# Altium PCB OmniCore_SDR.PcbDoc (part 2 of 13)
Units mil, origin at the board's own origin, x right, y up, seen from the top; angles counter-clockwise.
Board outline 4724.72 x 2755.91 mil, 8 copper layers (Top, GND 1, Layer 1, Layer 2, GND 2, Layer 3, Power, Bottom), stack 40.468 mil thick; 530 components, 427 nets, 2315 pads, 1715 vias.
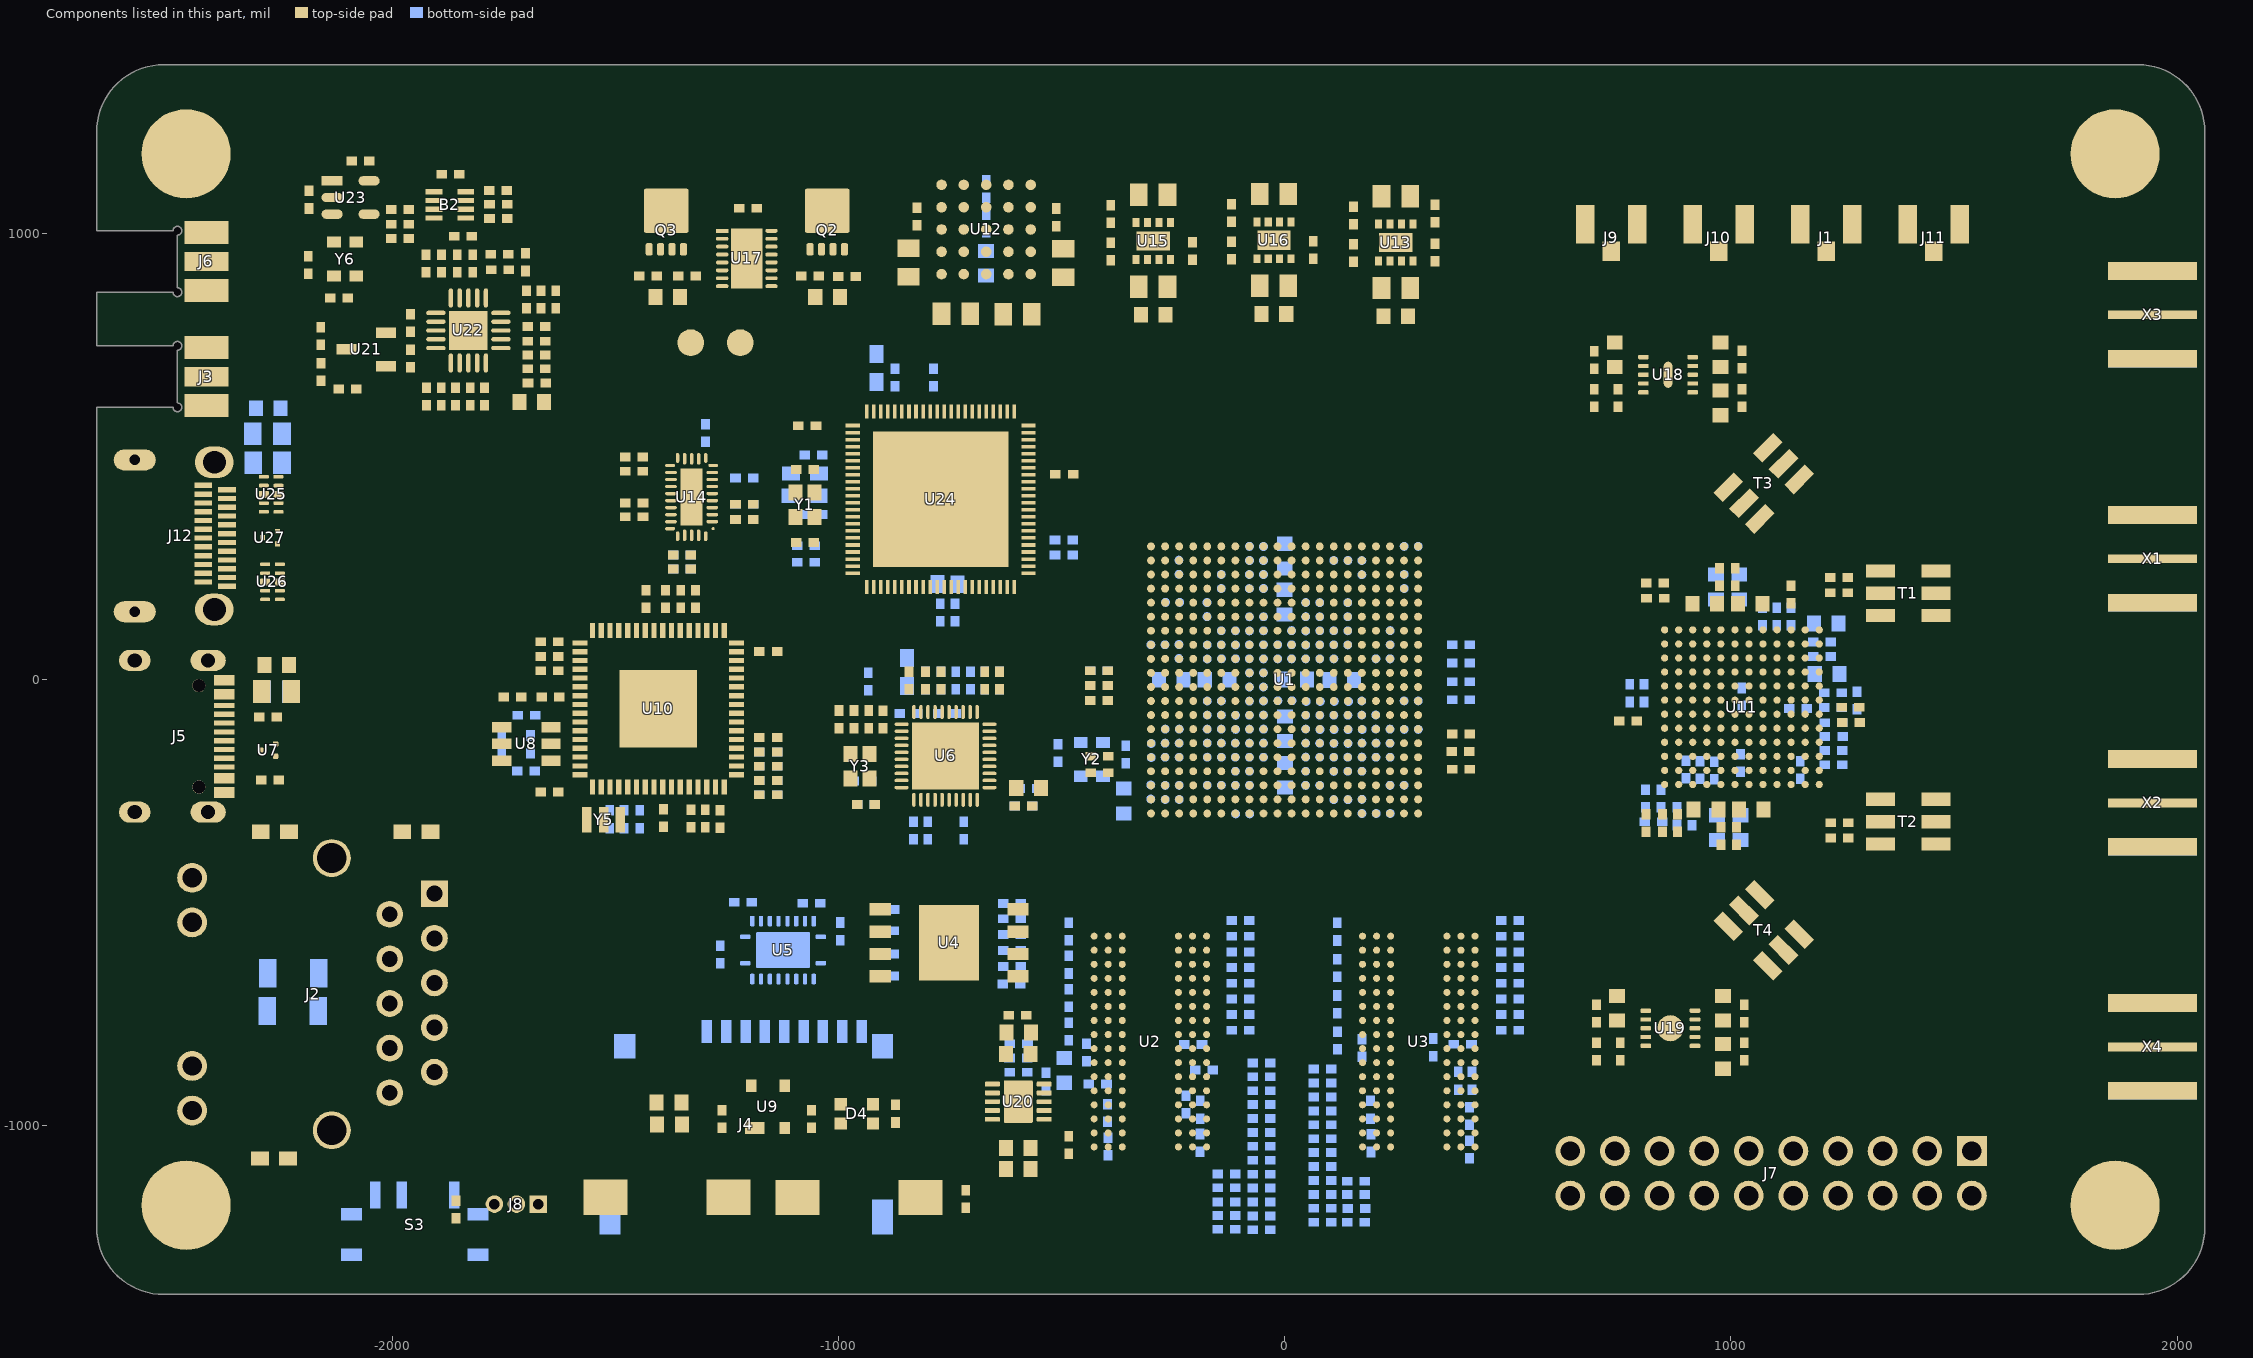
[diagram p8: the components of this part, seen from the top]

## Components (designator, comment, footprint, x,y, rotation, side; value= is the part's Value field where it differs from the comment) (continued)
R125 "R" R0402-L -1858.35,634.35 r90 top value=330
R126 "R" R0402-L -669,1099.69 r270 bottom value=45.5K
R127 "R" R0402-L -389.56,959.69 r270 top value=124K
R128 "R" R0402-L -119,961.37 r270 top value=124K
R129 "R" R0402-L -389.56,1043.69 r270 top value=39.7K
R130 "R" R0402-L -119,1045.37 r270 top value=180K
R131 "R" R0402-L -980.48,903.27 r180 top value=5.1K
R132 "R" R0402-L -1825.35,634.35 r90 top value=330
R133 "R" R0402-L -1793.35,634.35 r90 top value=330
R134 "R" R0402-L -1426.48,904.27 r0 top value=5.1K
R135 "R" R0402-L -1676.66,758.35 r0 top value=5.1k
R136 "R" R0402-L -1923.35,634.35 r90 top value=4.7k
R137 "R" R0402-L -1890.35,634.35 r90 top value=330
R138 "R" R0402-L -1982.35,1020.35 r180 top value=510k
R139 "R" R0402-L -1982.35,1053.35 r180 top value=510k
R140 "R" R0402-L -1763.35,1096.35 r180 top value=49.9
R141 "R" R0402-L -1762.35,1065.35 r180 top value=49.9
R142 "R" R0402-L -1841.03,993.35 r0 top value=49.9
R143 "R" R0402-L 394,-161 r180 top value=220
R144 "R" R0402-L 395,-122 r180 top value=49.9
R145 "R" R1206-L -2223,-743 r0 bottom value=1M
S1 "SW-PB2" SW-PB2-SMD -956,-1161 r270 top
S2 "SW-PB2" SW-PB2-SMD -1386,-1160 r270 top
S3 "SW-SPDT" SW-TH_MSK12C02 -1949.2,-1221.8 r180 bottom
T1 "TCM1-63AX+" FP-TCM1-63AX+-MFG 1397.48,193.46 r270 top
T2 "TCM1-63AX+" FP-TCM1-63AX+-MFG 1397.5,-318.54 r270 top
T3 "TCM1-63AX+" FP-TCM1-63AX+-MFG 1073.76,439.72 r315 top
T4 "TCM1-63AX+" FP-TCM1-63AX+-MFG 1073.5,-561.54 r225 top
TP1 "test point" TP -1220,755 r0 top
TP2 "test point" TP -1331,755 r90 top
U1 "XC7Z020-2CLG400I" CLG400 -0.24,-0.79 r90 top locked
U2 "MT41K256M16TW-107:P" FP-TW-IPC_C -300.99,-811.22 r0 top
U3 "MT41K256M16TW-107:P" FP-TW-IPC_C 300.51,-811.22 r0 top
U4 "W25Q256" WPDFN-8_L8.0-W6.0-P1.27-EP-BL -752,-590 r270 top
U5 "TXS0108ERGYR" FP-RGY0020A-MFG -1124.21,-606.04 r270 bottom
U6 "RTL8211FD-CG" WQFN-40_L5.0-W5.0-P0.4-BL-EP -760,-171 r0 top
U7 "TPD2EUSB30DRTR" DRT0003A -2278,-158 r180 top
U8 "93LC56BT-I/OT" FP-C04-028-MFG -1699.34,-144 r0 top
U9 "HX811T" SOT-143_L2.9-W1.3-P1.92-LS2.3-BL -1158.1,-957.7 r0 top
U10 "FT2232HQ" QFN50P900X900X90-65N-D -1403.54,-65.47 r90 top
U11 "AD9361" BGA144C80P12X12_1000X1000X170 1024.74,-61.79 r180 top locked
U12 "LTM4622EY#PBF" FP-BGA-25-05-08-1502-IPC_C -669,1008.69 r90 top
U13 "TPS82130SILT" SIL0008D_V 249,979.37 r270 top
U14 "HD3SS3220IRNHT" FP-RNH0030A-IPC_C -1329,409 r180 top
U15 "TPS82130SILT" SIL0008D_V -294.56,982.69 r270 top
U16 "TPS82130SILT" SIL0008D_V -24,984.37 r270 top
U17 "LTC4353IDE#PBF" FP-DE-16-05-08-1732-IPC_C -1205.24,943.69 r0 top
U18 "TPS7A9401DSCR" FP-DSC0010J-MFG#1 859.18,683.13 r0 top
U19 "TPS7A9401DSCR" FP-DSC0010J-MFG#2 864.39,-781.4 r0 top
U20 "TPS51200DRCR" DRC0010J_V -597,-946 r0 top
U21 "BAT54S" SOT-23-3 -2058.35,740.35 r180 top
U22 "ADF4002BCPZ" ADI-CP-20-1_N -1829.35,782.35 r270 top
U23 "SN74LVC1G04DBVRG4" FP-DBV0005A-IPC_C -2093.35,1080.35 r0 top
U24 "CH32H417MEU6" QFN-88_L10.0-W10.0-P0.40-BL-EP7.7 -771,404 r270 top
U25 "TPD4EUSB30DQAR" DQA0010A_V -2271.32,415.24 r0 top
U26 "TPD4EUSB30DQAR" DQA0010A_V -2268.32,218.87 r0 top
U27 "TPD2EUSB30DRTR" DRT0003A -2274,318 r180 top
X1 "SMA" SMA_ANGLE 2030,274.14 r180 top
X2 "SMA" SMA_ANGLE 2030,-272.72 r180 top
X3 "SMA" SMA_ANGLE 2030,821 r180 top
X4 "SMA" SMA_ANGLE 2030,-819.57 r180 top
Y1 "25MHz" CRYSTAL-SMD_4P-L2.0-W1.6-BL -1075,392 r90 top
Y2 "SX2M33.333M20F30TNN" XTAL-2520 -432,-178.8 r90 bottom value=33.333M
Y3 "25MHz" CRYSTAL-SMD_4P-L2.0-W1.6-BL -951.65,-194.44 r90 top
Y5 "12M" XTAL-3Pin -1526.34,-314 r180 top
Y6 "TX0873AA12AE" XTAL-2520 -2105.35,942.35 r90 top value=40M

## Footprints (in the part's own frame and the unit in brackets; to place one, negate y for a bottom-side part, rotate by r counter-clockwise, add the part's x,y. Pads: shape width x height; smd on the part's side, far side on the other; paste and mask are expansions set on the pad)
20279-001E [mm] "贴片天线座"
  rect 1x1.1 smd: 1(0,-1.55)
  rect 1.05x2.2 smd: 2(1.475,0) 3(-1.475,0)
  silkscreen extent -0.75,-2.7 0.75,1.3, body extent -1.5,-1.5 1.5,1.5, height 1.34
66012202111305 [mm] "MMCX PCB End Launch Jack"
  rect 1.1x2.5 smd: 1(0,3.9)
  rect 1.3x2.5 smd paste-2539.97 mask+0.102: 2(-1.65,3.9) 3(1.65,3.9)
  Top region: -2.3,-2.35 -2.3,5.15 -1,5.15 -1,2.25 -1.5,2.25 -1.527,2.363 -1.603,2.452 -1.711,2.497 -1.827,2.488 -1.927,2.427 -1.988,2.327 -1.997,2.211 -1.952,2.103 -1.863,2.027 -1.75,2 -1.75,2 -1.75,2 -1.75,-2.35
  Top region: 2.3,-2.35 2.3,5.15 1,5.15 1,2.25 1.5,2.25 1.527,2.363 1.603,2.452 1.711,2.497 1.827,2.488 1.927,2.427 1.988,2.327 1.997,2.211 1.952,2.103 1.863,2.027 1.75,2 1.75,2 1.75,2 1.75,-2.35
  Keep-Out Layer board cut-out: -1.75,-2.35 1.75,-2.35 1.75,2 1.863,2.027 1.952,2.103 1.997,2.211 1.988,2.327 1.927,2.427 1.827,2.488 1.711,2.497 1.603,2.452 1.527,2.363 1.5,2.25 1.5,2.25 -1.5,2.25 -1.527,2.363 -1.603,2.452 -1.711,2.497 -1.827,2.488 -1.927,2.427 -1.988,2.327 -1.997,2.211 -1.952,2.103 -1.863,2.027 -1.75,2 -1.75,2
  body extent -2.25,-2.25 2.25,5.25, height 2.1
ADI-CP-20-1_N [mm] "QFN, 20-Leads, Body 4x4mm, Pitch 0.5mm, Thermal Pad 2.2x2.2mm, IPC Medium Density"
  oval 1.1x0.25 smd: 1(-1.85,1) 2(-1.85,0.5) 3(-1.85,0) 4(-1.85,-0.5) 5(-1.85,-1) 11(1.85,-1) 12(1.85,-0.5) 13(1.85,0) 14(1.85,0.5) 15(1.85,1)
  oval 0.25x1.1 smd: 6(-1,-1.85) 7(-0.5,-1.85) 8(0,-1.85) 9(0.5,-1.85) 10(1,-1.85) 16(1,1.85) 17(0.5,1.85) 18(0,1.85) 19(-0.5,1.85) 20(-1,1.85)
  rect 2.2x2.2 smd: 21(0,0)
  silkscreen extent -2.97,-2.2 2.2,2.2, body extent -2.05,-2.05 2.05,2.05, height 1
BGA144C80P12X12_1000X1000X170 [mm]
  round 0.41 smd: A1(-4.4,4.4) A2(-3.6,4.4) A3(-2.8,4.4) A4(-2,4.4) A5(-1.2,4.4) A6(-0.4,4.4) A7(0.4,4.4) A8(1.2,4.4) A9(2,4.4) A10(2.8,4.4) A11(3.6,4.4) A12(4.4,4.4) B1(-4.4,3.6) B2(-3.6,3.6) B3(-2.8,3.6) B4(-2,3.6) B5(-1.2,3.6) B6(-0.4,3.6) B7(0.4,3.6) B8(1.2,3.6) B9(2,3.6) B10(2.8,3.6) B11(3.6,3.6) B12(4.4,3.6) C1(-4.4,2.8) C2(-3.6,2.8) C3(-2.8,2.8) C4(-2,2.8) C5(-1.2,2.8) C6(-0.4,2.8) C7(0.4,2.8) C8(1.2,2.8) C9(2,2.8) C10(2.8,2.8) C11(3.6,2.8) C12(4.4,2.8) D1(-4.4,2) D2(-3.6,2) D3(-2.8,2) D4(-2,2) D5(-1.2,2) D6(-0.4,2) D7(0.4,2) D8(1.2,2) D9(2,2) D10(2.8,2) D11(3.6,2) D12(4.4,2) E1(-4.4,1.2) E2(-3.6,1.2) E3(-2.8,1.2) E4(-2,1.2) E5(-1.2,1.2) E6(-0.4,1.2) E7(0.4,1.2) E8(1.2,1.2) E9(2,1.2) E10(2.8,1.2) E11(3.6,1.2) E12(4.4,1.2) F1(-4.4,0.4) F2(-3.6,0.4) F3(-2.8,0.4) F4(-2,0.4) F5(-1.2,0.4) F6(-0.4,0.4) F7(0.4,0.4) F8(1.2,0.4) F9(2,0.4) F10(2.8,0.4) F11(3.6,0.4) F12(4.4,0.4) G1(-4.4,-0.4) G2(-3.6,-0.4) G3(-2.8,-0.4) G4(-2,-0.4) G5(-1.2,-0.4) G6(-0.4,-0.4) G7(0.4,-0.4) G8(1.2,-0.4) G9(2,-0.4) G10(2.8,-0.4) G11(3.6,-0.4) G12(4.4,-0.4) H1(-4.4,-1.2) H2(-3.6,-1.2) H3(-2.8,-1.2) H4(-2,-1.2) H5(-1.2,-1.2) H6(-0.4,-1.2) H7(0.4,-1.2) H8(1.2,-1.2) H9(2,-1.2) H10(2.8,-1.2) H11(3.6,-1.2) H12(4.4,-1.2) J1(-4.4,-2) J2(-3.6,-2) J3(-2.8,-2) J4(-2,-2) J5(-1.2,-2) J6(-0.4,-2) J7(0.4,-2) J8(1.2,-2) J9(2,-2) J10(2.8,-2) J11(3.6,-2) J12(4.4,-2) K1(-4.4,-2.8) K2(-3.6,-2.8) K3(-2.8,-2.8) K4(-2,-2.8) K5(-1.2,-2.8) K6(-0.4,-2.8) K7(0.4,-2.8) K8(1.2,-2.8) K9(2,-2.8) K10(2.8,-2.8) K11(3.6,-2.8) K12(4.4,-2.8) L1(-4.4,-3.6) L2(-3.6,-3.6) L3(-2.8,-3.6) L4(-2,-3.6) L5(-1.2,-3.6) L6(-0.4,-3.6) L7(0.4,-3.6) L8(1.2,-3.6) L9(2,-3.6) L10(2.8,-3.6) L11(3.6,-3.6) L12(4.4,-3.6) M1(-4.4,-4.4) M2(-3.6,-4.4) M3(-2.8,-4.4) M4(-2,-4.4) M5(-1.2,-4.4) M6(-0.4,-4.4) M7(0.4,-4.4) M8(1.2,-4.4) M9(2,-4.4) M10(2.8,-4.4) M11(3.6,-4.4) M12(4.4,-4.4)
  silkscreen extent -5.1,-5 5,5.1, body extent -5,-5 5,5, height 1.7
C0402-L [mm] "Chip Capacitor, Body 1.0x0.5mm, 高密度"
  rect 0.6x0.5 smd: 1(-0.5,0) 2(0.5,0)
  silkscreen extent 0,-0.23 0,0.25, body extent -0.5,-0.25 0.5,0.25, height 0.49
C0402-S [mil] "C0402"
  round 20 smd: 1(-15.7,0) 2(15.9,0)
  silkscreen extent -31,-16 32,16, body extent -20,-10 20,10, height 20
C0603-L [mm] "贴片电容0603 高密度"
  rect 0.8x0.9 smd: 1(-0.7,0) 2(0.7,0)
  silkscreen extent 0,-0.39 0,0.41, body extent -0.8,-0.4 0.8,0.41, height 0.88
C0603-M [mm] "Capacitor SMD 0603 (1608)  低密度"
  rect 1.016x0.8 smd: 1(-0.8,0) 2(0.8,0)
  silkscreen extent 0,-0.39 0,0.41, body extent -0.77,-0.41 0.83,0.4, height 0.88
C0805-L [mil] "贴片电容0805-高密度"
  rect 39.37x50 smd: 1(-32,0) 2(32,0)
  silkscreen extent 0,-24 0,24, body extent -39,-25 39,25, height 24
C1206-L [mm] "Capacitor 1206 (3216) for Startronics  高密度"
  rect 1x1.6 smd: 1(-1.45,0) 2(1.45,0)
  silkscreen extent -0.64,-0.56 0.63,0.58, body extent -1.63,-0.8 1.57,0.8, height 1
CLG400 [mm] "BGA, 400-Balls, Body 17x17mm, Pitch 0.8mm"
  round 0.45 smd: A1(-7.6,7.6) A2(-6.8,7.6) A3(-6,7.6) A4(-5.2,7.6) A5(-4.4,7.6) A6(-3.6,7.6) A7(-2.8,7.6) A8(-2,7.6) A9(-1.2,7.6) A10(-0.4,7.6) A11(0.4,7.6) A12(1.2,7.6) A13(2,7.6) A14(2.8,7.6) A15(3.6,7.6) A16(4.4,7.6) A17(5.2,7.6) A18(6,7.6) A19(6.8,7.6) A20(7.6,7.6) B1(-7.6,6.8) B2(-6.8,6.8) B3(-6,6.8) B4(-5.2,6.8) B5(-4.4,6.8) B6(-3.6,6.8) B7(-2.8,6.8) B8(-2,6.8) B9(-1.2,6.8) B10(-0.4,6.8) B11(0.4,6.8) B12(1.2,6.8) B13(2,6.8) B14(2.8,6.8) B15(3.6,6.8) B16(4.4,6.8) B17(5.2,6.8) B18(6,6.8) B19(6.8,6.8) B20(7.6,6.8) C1(-7.6,6) C2(-6.8,6) C3(-6,6) C4(-5.2,6) C5(-4.4,6) C6(-3.6,6) C7(-2.8,6) C8(-2,6) C9(-1.2,6) C10(-0.4,6) C11(0.4,6) C12(1.2,6) C13(2,6) C14(2.8,6) C15(3.6,6) C16(4.4,6) C17(5.2,6) C18(6,6) C19(6.8,6) C20(7.6,6) D1(-7.6,5.2) D2(-6.8,5.2) D3(-6,5.2) D4(-5.2,5.2) D5(-4.4,5.2) D6(-3.6,5.2) D7(-2.8,5.2) D8(-2,5.2) D9(-1.2,5.2) D10(-0.4,5.2) D11(0.4,5.2) D12(1.2,5.2) D13(2,5.2) D14(2.8,5.2) D16(4.4,5.2) D17(5.2,5.2) D18(6,5.2) D19(6.8,5.2) D20(7.6,5.2) E1(-7.6,4.4) E2(-6.8,4.4) E3(-6,4.4) E4(-5.2,4.4) E5(-4.4,4.4) E6(-3.6,4.4) E7(-2.8,4.4) E8(-2,4.4) E9(-1.2,4.4) E10(-0.4,4.4) E11(0.4,4.4) E12(1.2,4.4) E13(2,4.4) E14(2.8,4.4) E15(3.6,4.4) E16(4.4,4.4) E17(5.2,4.4) E18(6,4.4) E19(6.8,4.4) E20(7.6,4.4) F1(-7.6,3.6) F2(-6.8,3.6) F3(-6,3.6) F4(-5.2,3.6) F5(-4.4,3.6) F6(-3.6,3.6) F7(-2.8,3.6) F8(-2,3.6) F9(-1.2,3.6) F10(-0.4,3.6) F11(0.4,3.6) F12(1.2,3.6) F13(2,3.6) F14(2.8,3.6) F15(3.6,3.6) F16(4.4,3.6) F17(5.2,3.6) F18(6,3.6) F19(6.8,3.6) F20(7.6,3.6) G1(-7.6,2.8) G2(-6.8,2.8) G3(-6,2.8) G4(-5.2,2.8) G5(-4.4,2.8) G6(-3.6,2.8) G7(-2.8,2.8) G8(-2,2.8) G9(-1.2,2.8) G10(-0.4,2.8) G11(0.4,2.8) G12(1.2,2.8) G13(2,2.8) G14(2.8,2.8) G15(3.6,2.8) G16(4.4,2.8) G17(5.2,2.8) G18(6,2.8) G19(6.8,2.8) G20(7.6,2.8) H1(-7.6,2) H2(-6.8,2) H3(-6,2) H4(-5.2,2) H5(-4.4,2) H6(-3.6,2) H7(-2.8,2) H8(-2,2) H9(-1.2,2) H10(-0.4,2) H11(0.4,2) H12(1.2,2) H13(2,2) H14(2.8,2) H15(3.6,2) H16(4.4,2) H17(5.2,2) H18(6,2) H19(6.8,2) H20(7.6,2) J1(-7.6,1.2) J2(-6.8,1.2) J3(-6,1.2) J4(-5.2,1.2) J5(-4.4,1.2) J6(-3.6,1.2) J7(-2.8,1.2) J8(-2,1.2) J9(-1.2,1.2) J10(-0.4,1.2) J11(0.4,1.2) J12(1.2,1.2) J13(2,1.2) J14(2.8,1.2) J15(3.6,1.2) J16(4.4,1.2) J17(5.2,1.2) J18(6,1.2) J19(6.8,1.2) J20(7.6,1.2) K1(-7.6,0.4) K2(-6.8,0.4) K3(-6,0.4) K4(-5.2,0.4) K5(-4.4,0.4) K6(-3.6,0.4) K7(-2.8,0.4) K8(-2,0.4) K9(-1.2,0.4) K10(-0.4,0.4) K11(0.4,0.4) K12(1.2,0.4) K13(2,0.4) K14(2.8,0.4) K15(3.6,0.4) K16(4.4,0.4) K17(5.2,0.4) K18(6,0.4) K19(6.8,0.4) K20(7.6,0.4) L1(-7.6,-0.4) L2(-6.8,-0.4) L3(-6,-0.4) L4(-5.2,-0.4) L5(-4.4,-0.4) L6(-3.6,-0.4) L7(-2.8,-0.4) L8(-2,-0.4) L9(-1.2,-0.4) L10(-0.4,-0.4) L11(0.4,-0.4) L12(1.2,-0.4) L13(2,-0.4) L14(2.8,-0.4) L15(3.6,-0.4) L16(4.4,-0.4) L17(5.2,-0.4) L18(6,-0.4) L19(6.8,-0.4) L20(7.6,-0.4) M1(-7.6,-1.2) M2(-6.8,-1.2) M3(-6,-1.2) M4(-5.2,-1.2) M5(-4.4,-1.2) M6(-3.6,-1.2) M7(-2.8,-1.2) M8(-2,-1.2) M9(-1.2,-1.2) M10(-0.4,-1.2) M11(0.4,-1.2) M12(1.2,-1.2) M13(2,-1.2) M14(2.8,-1.2) M15(3.6,-1.2) M16(4.4,-1.2) M17(5.2,-1.2) M18(6,-1.2) M19(6.8,-1.2) M20(7.6,-1.2) N1(-7.6,-2) N2(-6.8,-2) N3(-6,-2) N4(-5.2,-2) N5(-4.4,-2) N6(-3.6,-2) N7(-2.8,-2) N8(-2,-2) N9(-1.2,-2) N10(-0.4,-2) N11(0.4,-2) N12(1.2,-2) N13(2,-2) N14(2.8,-2) N15(3.6,-2) N16(4.4,-2) N17(5.2,-2) N18(6,-2) N19(6.8,-2) N20(7.6,-2) P1(-7.6,-2.8) P2(-6.8,-2.8) P3(-6,-2.8) P4(-5.2,-2.8) P5(-4.4,-2.8) P6(-3.6,-2.8) P7(-2.8,-2.8) P8(-2,-2.8) P9(-1.2,-2.8) P10(-0.4,-2.8) P11(0.4,-2.8) P12(1.2,-2.8) P13(2,-2.8) P14(2.8,-2.8) P15(3.6,-2.8) P16(4.4,-2.8) P17(5.2,-2.8) P18(6,-2.8) P19(6.8,-2.8) P20(7.6,-2.8) R1(-7.6,-3.6) R2(-6.8,-3.6) R3(-6,-3.6) R4(-5.2,-3.6) R5(-4.4,-3.6) R6(-3.6,-3.6) R7(-2.8,-3.6) R8(-2,-3.6) R9(-1.2,-3.6) R10(-0.4,-3.6) R11(0.4,-3.6) R12(1.2,-3.6) R13(2,-3.6) R14(2.8,-3.6) R15(3.6,-3.6) R16(4.4,-3.6) R17(5.2,-3.6) R18(6,-3.6) R19(6.8,-3.6) R20(7.6,-3.6) T1(-7.6,-4.4) T2(-6.8,-4.4) T3(-6,-4.4) T4(-5.2,-4.4) T5(-4.4,-4.4) T6(-3.6,-4.4) T7(-2.8,-4.4) T8(-2,-4.4) T9(-1.2,-4.4) T10(-0.4,-4.4) T11(0.4,-4.4) T12(1.2,-4.4) T13(2,-4.4) T14(2.8,-4.4) T15(3.6,-4.4) T16(4.4,-4.4) T17(5.2,-4.4) T18(6,-4.4) T19(6.8,-4.4) T20(7.6,-4.4) U1(-7.6,-5.2) U2(-6.8,-5.2) U3(-6,-5.2) U4(-5.2,-5.2) U5(-4.4,-5.2) U6(-3.6,-5.2) U7(-2.8,-5.2) U8(-2,-5.2) U9(-1.2,-5.2) U10(-0.4,-5.2) U11(0.4,-5.2) U12(1.2,-5.2) U13(2,-5.2) U14(2.8,-5.2) U15(3.6,-5.2) U16(4.4,-5.2) U17(5.2,-5.2) U18(6,-5.2) U19(6.8,-5.2) U20(7.6,-5.2) V1(-7.6,-6) V2(-6.8,-6) V3(-6,-6) V4(-5.2,-6) V5(-4.4,-6) V6(-3.6,-6) V7(-2.8,-6) V8(-2,-6) V9(-1.2,-6) V10(-0.4,-6) V11(0.4,-6) V12(1.2,-6) V13(2,-6) V14(2.8,-6) V15(3.6,-6) V16(4.4,-6) V17(5.2,-6) V18(6,-6) V19(6.8,-6) V20(7.6,-6) W1(-7.6,-6.8) W2(-6.8,-6.8) W3(-6,-6.8) W4(-5.2,-6.8) W5(-4.4,-6.8) W6(-3.6,-6.8) W7(-2.8,-6.8) W8(-2,-6.8) W9(-1.2,-6.8) W10(-0.4,-6.8) W11(0.4,-6.8) W12(1.2,-6.8) W13(2,-6.8) W14(2.8,-6.8) W15(3.6,-6.8) W16(4.4,-6.8) W17(5.2,-6.8) W18(6,-6.8) W19(6.8,-6.8) W20(7.6,-6.8) Y1(-7.6,-7.6) Y2(-6.8,-7.6) Y3(-6,-7.6) Y4(-5.2,-7.6) Y5(-4.4,-7.6) Y6(-3.6,-7.6) Y7(-2.8,-7.6) Y8(-2,-7.6) Y9(-1.2,-7.6) Y10(-0.4,-7.6) Y11(0.4,-7.6) Y12(1.2,-7.6) Y13(2,-7.6) Y14(2.8,-7.6) Y15(3.6,-7.6) Y16(4.4,-7.6) Y17(5.2,-7.6) Y18(6,-7.6) Y19(6.8,-7.6) Y20(7.6,-7.6)
  round 0.45 smd mask+0.102: D15(3.6,5.2)
  silkscreen extent -9.27,-8.5 8.5,8.5, body extent -8.5,-8.5 8.5,8.5, height 1.6
CONN-TH_3P-P1.25_CAX_1.25-3A [mm]
  rect 1x1 hole 0.6 paste+0 mask+0.05: 1(-1.25,0)
  round 1 hole 0.6 paste+0 mask+0.05: 2(0,0) 3(1.25,0)
  silkscreen extent -2.76,-2.04 2.75,1.16, body extent -2.83,-2.04 2.83,1.27, height 4.6
CRYSTAL-SMD_4P-L2.0-W1.6-BL [mm]
  rect 0.9x0.8 smd: 1(-0.7,-0.55) 2(0.7,-0.55) 3(0.7,0.55) 4(-0.7,0.55)
  silkscreen extent -1.65,-1.45 1.35,1.15, body extent -1.05,-0.77 0.95,0.83, height 0.8
DQA0010A_V [mm] "SON, 10-Leads, Body 1x2.5mm, Pitch 0.5mm, TI Recommended"
  rrect50% 0.565x0.2 smd: 1(-0.417,1) 2(-0.417,0.5) 4(-0.417,-0.5) 5(-0.417,-1) 6(0.417,-1) 7(0.417,-0.5) 9(0.417,0.5) 10(0.417,1)
  rrect28% 0.565x0.36 on Top Paste: 3(-0.417,0) 8(0.417,0)
  rrect25% 0.565x0.4 smd paste-0.2: 3(-0.417,0) 8(0.417,0)
  silkscreen extent -0.67,-1.45 0.55,1.45, body extent -0.55,-1.3 0.55,1.3, height 0.56
DRC0010J_V [mm] "SON, 10-Leads, Body 3x3mm, Pitch 0.5mm, Thermal Pad 2.4x1.65mm, TI Recommended"
  rrect36% 0.85x0.28 smd paste-0.025 mask+0.07: 1(-1.475,1) 2(-1.475,0.5) 3(-1.475,0) 4(-1.475,-0.5) 5(-1.475,-1) 6(1.475,-1) 7(1.475,-0.5) 8(1.475,0) 9(1.475,0.5) 10(1.475,1)
  rrect6% 1.65x2.4 smd paste-0.825 mask+0.07: 11(0,0)
  Top region: -0.39,-1.9 -0.11,-1.9 -0.11,-1.2 -0.39,-1.2
  Top region: 0.39,-1.2 0.11,-1.2 0.11,-1.9 0.39,-1.9
  Top region: 0.39,1.9 0.11,1.9 0.11,1.2 0.39,1.2
  Top region: -0.39,1.2 -0.11,1.2 -0.11,1.9 -0.39,1.9
  silkscreen extent -2.15,-1.7 1.7,1.7, body extent -1.55,-1.55 1.55,1.55, height 1
DRT0003A [mm] "SOTFL, 3-Leads, Body 1x1mm (inc leads), Pitch 0.35mm"
  rrect33% 0.3x0.3 smd: 1(-0.425,0.35) 2(-0.425,-0.35) 3(0.425,0)
  silkscreen extent 0.13,-0.55 0.43,0.55, body extent -0.5,-0.5 0.5,0.5, height 0.5
FP-BGA-25-05-08-1502-IPC_C [mm]
  round 0.6 smd paste+0 mask+0: A1(-2.54,2.54) A2(-1.27,2.54) A3(0,2.54) A4(1.27,2.54) A5(2.54,2.54) B1(-2.54,1.27) B2(-1.27,1.27) B3(0,1.27) B4(1.27,1.27) B5(2.54,1.27) C1(-2.54,0) C2(-1.27,0) C3(0,0) C4(1.27,0) C5(2.54,0) D1(-2.54,-1.27) D2(-1.27,-1.27) D3(0,-1.27) D4(1.27,-1.27) D5(2.54,-1.27) E1(-2.54,-2.54) E2(-1.27,-2.54) E3(0,-2.54) E4(1.27,-2.54) E5(2.54,-2.54)
  silkscreen extent -3.75,-3.13 3.13,3.13, body extent -3.22,-3.22 3.22,3.22, height 0.25
FP-C04-028-MFG [mm]
  rect 1.1x0.6 smd paste+0 mask+0: 1(-1.4,0.95) 2(-1.4,0) 3(-1.4,-0.95) 4(1.4,-0.95) 5(1.4,0) 6(1.4,0.95)
  silkscreen extent -2.65,-1.55 0.48,1.55, body extent -2.05,-1.88 2.05,1.88, height 0.25
FP-DBV0005A-IPC_C [mm]
  rect 1.205x0.532 smd paste+0 mask+0: 1(-1.05,0.95)
  rrect100% 1.205x0.532 smd paste+0 mask+0: 2(-1.05,0) 3(-1.05,-0.95) 4(1.05,-0.95) 5(1.05,0.95)
  silkscreen extent -2.45,-1.45 0.05,1.45, body extent -1.75,-1.55 1.75,1.55, height 0.25
FP-DE-16-05-08-1732-IPC_C [mm]
  rect 0.706x0.222 smd paste+0 mask+0: 1(-1.403,1.575)
  rrect100% 0.706x0.222 smd paste+0 mask+0: 2(-1.403,1.125) 3(-1.403,0.675) 4(-1.403,0.225) 5(-1.403,-0.225) 6(-1.403,-0.675) 7(-1.403,-1.125) 8(-1.403,-1.575) 9(1.403,-1.575) 10(1.403,-1.125) 11(1.403,-0.675) 12(1.403,-0.225) 13(1.403,0.225) 14(1.403,0.675) 15(1.403,1.125) 16(1.403,1.575)
  rect 1.8x3.4 smd paste-1000 mask+0: 17(0,0)
  silkscreen extent -2.28,-2 1.5,2, body extent -1.86,-2.1 1.86,2.1, height 0.25
FP-DNH0008A-MFG [mm]
  rrect50% 0.7x0.4 smd paste-1000 mask-1000: 1(-1.55,0.975) 2(-1.55,0.325) 3(-1.55,-0.325) 4(-1.55,-0.975)
  rrect8% 2.51x2.55 smd paste-1000 mask-1000: 5-6-7-8(0.645,0)
  silkscreen extent -2.57,-1.73 1.55,1.73, body extent -2,-1.88 2,1.88, height 0.25
FP-DSC0010J-MFG#1 [mm]
  rrect42% 0.6x0.24 smd paste+0 mask+0: 1(-1.4,1) 2(-1.4,0.5) 3(-1.4,0) 4(-1.4,-0.5) 5(-1.4,-1) 6(1.4,-1) 7(1.4,-0.5) 8(1.4,0) 9(1.4,0.5) 10(1.4,1)
  oval 0.508x1.485 smd paste-1000 mask+0: 11(0,0)
  Top region: -0.375,-1.2 -0.375,-1.65 -0.371,-1.669 -0.36,-1.685 -0.344,-1.696 -0.325,-1.7 -0.325,-1.7 -0.175,-1.7 -0.156,-1.696 -0.14,-1.685 -0.129,-1.669 -0.125,-1.65 -0.125,-1.65 -0.125,-1.2 0.125,-1.2 0.125,-1.65 0.129,-1.669 0.14,-1.685 0.156,-1.696 0.175,-1.7 0.175,-1.7 0.325,-1.7 0.344,-1.696 0.36,-1.685 0.371,-1.669 0.375,-1.65 0.375,-1.65 0.375,-1.2 0.775,-1.2 0.794,-1.196 0.81,-1.185 0.821,-1.169 0.825,-1.15 0.825,-1.15 0.825,1.15 0.818,1.175 0.8,1.193 0.775,1.2 0.775,1.2 0.375,1.2 0.375,1.65 0.368,1.675 0.35,1.693 0.325,1.7 0.325,1.7 0.175,1.7 0.156,1.696 0.14,1.685 0.129,1.669 0.125,1.65 0.125,1.65 0.125,1.2 -0.125,1.2 -0.125,1.65 -0.132,1.675 -0.15,1.693 -0.175,1.7 -0.175,1.7 -0.325,1.7 -0.344,1.696 -0.36,1.685 -0.371,1.669 -0.375,1.65 -0.375,1.65 -0.375,1.2 -0.775,1.2 -0.794,1.196 -0.81,1.185 -0.821,1.169 -0.825,1.15 -0.825,1.15 -0.825,-1.15 -0.821,-1.169 -0.81,-1.185 -0.794,-1.196 -0.775,-1.2 -0.775,-1.2 -0.775,-1.2
  silkscreen extent -2.4,-1.55 1.55,1.55, body extent -1.8,-1.8 1.8,1.8, height 0.25
FP-DSC0010J-MFG#2 [mm]
  rrect42% 0.6x0.24 smd paste+0 mask+0: 1(-1.4,1) 2(-1.4,0.5) 3(-1.4,0) 4(-1.4,-0.5) 5(-1.4,-1) 6(1.4,-1) 7(1.4,-0.5) 8(1.4,0) 9(1.4,0.5) 10(1.4,1)
  round 1.485 smd paste-1000 mask+0: 11(0,0)
  Top region: -0.375,-1.2 -0.375,-1.65 -0.371,-1.669 -0.36,-1.685 -0.344,-1.696 -0.325,-1.7 -0.325,-1.7 -0.175,-1.7 -0.156,-1.696 -0.14,-1.685 -0.129,-1.669 -0.125,-1.65 -0.125,-1.65 -0.125,-1.2 0.125,-1.2 0.125,-1.65 0.129,-1.669 0.14,-1.685 0.156,-1.696 0.175,-1.7 0.175,-1.7 0.325,-1.7 0.344,-1.696 0.36,-1.685 0.371,-1.669 0.375,-1.65 0.375,-1.65 0.375,-1.2 0.775,-1.2 0.794,-1.196 0.81,-1.185 0.821,-1.169 0.825,-1.15 0.825,-1.15 0.825,1.15 0.818,1.175 0.8,1.193 0.775,1.2 0.775,1.2 0.375,1.2 0.375,1.65 0.368,1.675 0.35,1.693 0.325,1.7 0.325,1.7 0.175,1.7 0.156,1.696 0.14,1.685 0.129,1.669 0.125,1.65 0.125,1.65 0.125,1.2 -0.125,1.2 -0.125,1.65 -0.132,1.675 -0.15,1.693 -0.175,1.7 -0.175,1.7 -0.325,1.7 -0.344,1.696 -0.36,1.685 -0.371,1.669 -0.375,1.65 -0.375,1.65 -0.375,1.2 -0.775,1.2 -0.794,1.196 -0.81,1.185 -0.821,1.169 -0.825,1.15 -0.825,1.15 -0.825,-1.15 -0.821,-1.169 -0.81,-1.185 -0.794,-1.196 -0.775,-1.2 -0.775,-1.2 -0.775,-1.2
  silkscreen extent -2.4,-1.55 1.55,1.55, body extent -1.8,-1.8 1.8,1.8, height 0.25
FP-RGY0020A-MFG [mm]
  rrect42% 0.24x0.6 smd paste+0 mask+0: 1(-0.75,2.15) 10(-0.75,-2.15) 11(0.75,-2.15) 20(0.75,2.15)
  rrect42% 0.6x0.24 smd paste+0 mask+0: 2(-1.65,1.75) 3(-1.65,1.25) 4(-1.65,0.75) 5(-1.65,0.25) 6(-1.65,-0.25) 7(-1.65,-0.75) 8(-1.65,-1.25) 9(-1.65,-1.75) 12(1.65,-1.75) 13(1.65,-1.25) 14(1.65,-0.75) 15(1.65,-0.25) 16(1.65,0.25) 17(1.65,0.75) 18(1.65,1.25) 19(1.65,1.75)
  rrect5% 2.05x3.05 smd paste-1000 mask+0: 21(0,0)
  silkscreen extent -1.83,-2.32 1.83,3.13, body extent -1.75,-2.25 1.75,2.25, height 1
FP-RNH0030A-IPC_C [mm]
  round 0.173 smd paste+0 mask+0: 1(-1.226,1.8)
  rrect100% 0.661x0.192 smd paste+0 mask+0: 2(-1.176,1.4) 3(-1.176,1) 4(-1.176,0.6) 5(-1.176,0.2) 6(-1.176,-0.2) 7(-1.176,-0.6) 8(-1.176,-1) 9(-1.176,-1.4) 17(1.176,-1.4) 18(1.176,-1) 19(1.176,-0.6) 20(1.176,-0.2) 21(1.176,0.2) 22(1.176,0.6) 23(1.176,1) 24(1.176,1.4)
  rrect100% 0.56x0.192 smd paste+0 mask+0: 10(-1.226,-1.8) 16(1.226,-1.8) 25(1.226,1.8)
  rrect100% 0.192x0.56 smd paste+0 mask+0: 11(-0.8,-2.226) 15(0.8,-2.226) 26(0.8,2.226) 30(-0.8,2.226)
  rrect100% 0.192x0.661 smd paste+0 mask+0: 12(-0.4,-2.176) 13(0,-2.176) 14(0.4,-2.176) 27(0.4,2.176) 28(0,2.176) 29(-0.4,2.176)
  rect 1.25x3.25 smd paste-1000 mask+0: 31(0,0)
  Top region: -1.506,1.896 -1.042,1.896 -1.005,1.889 -0.974,1.868 -0.953,1.837 -0.946,1.8 -0.946,1.8 -0.953,1.763 -0.974,1.732 -1.005,1.711 -1.042,1.704 -1.042,1.704 -1.506,1.704
  silkscreen extent -2.03,-2.25 1.25,2.25, body extent -1.61,-2.61 1.61,2.61, height 0.25
FP-TCM1-63AX+-MFG [mm]
  rect 0.76x1.65 smd paste+0 mask+0: 1(-1.27,1.59) 2(0,1.59) 3(1.27,1.59) 4(1.27,-1.59) 5(0,-1.59) 6(-1.27,-1.59)
  silkscreen extent -1.91,-0.39 1.91,3.12, body extent -2,-2.51 2,2.51, height 0.25
FP-TW-IPC_C [mm]
  round 0.399 smd paste+0 mask+0: A1(-3.2,6) A2(-2.4,6) A3(-1.6,6) A7(1.6,6) A8(2.4,6) A9(3.2,6) B1(-3.2,5.2) B2(-2.4,5.2) B3(-1.6,5.2) B7(1.6,5.2) B8(2.4,5.2) B9(3.2,5.2) C1(-3.2,4.4) C2(-2.4,4.4) C3(-1.6,4.4) C7(1.6,4.4) C8(2.4,4.4) C9(3.2,4.4) D1(-3.2,3.6) D2(-2.4,3.6) D3(-1.6,3.6) D7(1.6,3.6) D8(2.4,3.6) D9(3.2,3.6) E1(-3.2,2.8) E2(-2.4,2.8) E3(-1.6,2.8) E7(1.6,2.8) E8(2.4,2.8) E9(3.2,2.8) F1(-3.2,2) F2(-2.4,2) F3(-1.6,2) F7(1.6,2) F8(2.4,2) F9(3.2,2) G1(-3.2,1.2) G2(-2.4,1.2) G3(-1.6,1.2) G7(1.6,1.2) G8(2.4,1.2) G9(3.2,1.2) H1(-3.2,0.4) H2(-2.4,0.4) H3(-1.6,0.4) H7(1.6,0.4) H8(2.4,0.4) H9(3.2,0.4) J1(-3.2,-0.4) J2(-2.4,-0.4) J3(-1.6,-0.4) J7(1.6,-0.4) J8(2.4,-0.4) J9(3.2,-0.4) K1(-3.2,-1.2) K2(-2.4,-1.2) K3(-1.6,-1.2) K7(1.6,-1.2) K8(2.4,-1.2) K9(3.2,-1.2) L1(-3.2,-2) L2(-2.4,-2) L3(-1.6,-2) L7(1.6,-2) L8(2.4,-2) L9(3.2,-2) M1(-3.2,-2.8) M2(-2.4,-2.8) M3(-1.6,-2.8) M7(1.6,-2.8) M8(2.4,-2.8) M9(3.2,-2.8) N1(-3.2,-3.6) N2(-2.4,-3.6) N3(-1.6,-3.6) N7(1.6,-3.6) N8(2.4,-3.6) N9(3.2,-3.6) P1(-3.2,-4.4) P2(-2.4,-4.4) P3(-1.6,-4.4) P7(1.6,-4.4) P8(2.4,-4.4) P9(3.2,-4.4) R1(-3.2,-5.2) R2(-2.4,-5.2) R3(-1.6,-5.2) R7(1.6,-5.2) R8(2.4,-5.2) R9(3.2,-5.2) T1(-3.2,-6) T2(-2.4,-6) T3(-1.6,-6) T7(1.6,-6) T8(2.4,-6) T9(3.2,-6)
  silkscreen extent -4.55,-7 4,7, body extent -4.1,-7.1 4.1,7.1, height 0.25
HDR-TH_20P-P2.54-V-M-R2-C10-S2.54 [mm]
  rect 1.7x1.7 hole 1.1: 1(-11.43,-1.27)
  round 1.7 hole 1.1: 2(-11.43,1.27) 3(-8.89,-1.27) 4(-8.89,1.27) 5(-6.35,-1.27) 6(-6.35,1.27) 7(-3.81,-1.27) 8(-3.81,1.27) 9(-1.27,-1.27) 10(-1.27,1.27) 11(1.27,-1.27) 12(1.27,1.27) 13(3.81,-1.27) 14(3.81,1.27) 15(6.35,-1.27) 16(6.35,1.27) 17(8.89,-1.27) 18(8.89,1.27) 19(11.43,-1.27) 20(11.43,1.27)
  silkscreen extent -12.7,-2.54 12.7,2.54, body extent -12.65,-2.5 12.66,2.5, height 8.5
L0603 [mm] "贴片电感0603 (1608)  低密度"
  rect 0.8x0.9 smd: 1(-0.7,0) 2(0.7,0)
  silkscreen extent 0,-0.39 0,0.41, body extent -0.83,-0.45 0.83,0.45, height 0.84
LED_0603_L [mm]
  rect 0.8x0.9 smd: 1(-0.7,0) 2(0.7,0)
  silkscreen extent 0,-0.43 1.37,0.43, body extent -0.81,-0.42 0.81,0.42, height 0.6
QFN50P900X900X90-65N-D [mm]
  rect 0.85x0.3 smd: 1(-4.45,3.75) 2(-4.45,3.25) 3(-4.45,2.75) 4(-4.45,2.25) 5(-4.45,1.75) 6(-4.45,1.25) 7(-4.45,0.75) 8(-4.45,0.25) 9(-4.45,-0.25) 10(-4.45,-0.75) 11(-4.45,-1.25) 12(-4.45,-1.75) 13(-4.45,-2.25) 14(-4.45,-2.75) 15(-4.45,-3.25) 16(-4.45,-3.75) 33(4.45,-3.75) 34(4.45,-3.25) 35(4.45,-2.75) 36(4.45,-2.25) 37(4.45,-1.75) 38(4.45,-1.25) 39(4.45,-0.75) 40(4.45,-0.25) 41(4.45,0.25) 42(4.45,0.75) 43(4.45,1.25) 44(4.45,1.75) 45(4.45,2.25) 46(4.45,2.75) 47(4.45,3.25) 48(4.45,3.75)
  rect 4.4x4.4 smd: 1(0,0)
  rect 0.3x0.85 smd: 17(-3.75,-4.45) 18(-3.25,-4.45) 19(-2.75,-4.45) 20(-2.25,-4.45) 21(-1.75,-4.45) 22(-1.25,-4.45) 23(-0.75,-4.45) 24(-0.25,-4.45) 25(0.25,-4.45) 26(0.75,-4.45) 27(1.25,-4.45) 28(1.75,-4.45) 29(2.25,-4.45) 30(2.75,-4.45) 31(3.25,-4.45) 32(3.75,-4.45) 49(3.75,4.45) 50(3.25,4.45) 51(2.75,4.45) 52(2.25,4.45) 53(1.75,4.45) 54(1.25,4.45) 55(0.75,4.45) 56(0.25,4.45) 57(-0.25,4.45) 58(-0.75,4.45) 59(-1.25,4.45) 60(-1.75,4.45) 61(-2.25,4.45) 62(-2.75,4.45) 63(-3.25,4.45) 64(-3.75,4.45)
  silkscreen extent -5,4.38 -4.75,4.62, body extent -4.52,-4.54 4.58,4.56, height 0.9
QFN-88_L10.0-W10.0-P0.40-BL-EP7.7 [mil]
  rect 7.9x31.5 smd paste-3937 mask+2: 1(-165.4,-196.9) 2(-149.6,-196.9) 3(-133.9,-196.9) 4(-118.1,-196.9) 5(-102.4,-196.9) 6(-86.6,-196.9) 7(-70.9,-196.9) 8(-55.1,-196.9) 9(-39.4,-196.9) 10(-23.6,-196.9) 11(-7.9,-196.9) 12(7.9,-196.9) 13(23.6,-196.9) 14(39.4,-196.9) 15(55.1,-196.9) 16(70.9,-196.9) 17(86.6,-196.9) 18(102.4,-196.9) 19(118.1,-196.9) 20(133.9,-196.9) 21(149.6,-196.9) 22(165.4,-196.9) 45(165.4,196.8) 46(149.6,196.8) 47(133.9,196.8) 48(118.1,196.8) 49(102.4,196.8) 50(86.6,196.8) 51(70.9,196.8) 52(55.1,196.8) 53(39.4,196.8) 54(23.6,196.8) 55(7.9,196.8) 56(-7.9,196.8) 57(-23.6,196.8) 58(-39.4,196.8) 59(-55.1,196.8) 60(-70.9,196.8) 61(-86.6,196.8) 62(-102.4,196.8) 63(-118.1,196.8) 64(-133.9,196.8) 65(-149.6,196.8) 66(-165.4,196.8)
  rect 31.5x7.9 smd paste-3937 mask+2: 23(196.8,-165.4) 24(196.8,-149.6) 25(196.8,-133.9) 26(196.8,-118.2) 27(196.8,-102.4) 28(196.8,-86.7) 29(196.8,-70.9) 30(196.8,-55.2) 31(196.8,-39.4) 32(196.8,-23.7) 33(196.8,-7.9) 34(196.8,7.8) 35(196.8,23.6) 36(196.8,39.3) 37(196.8,55.1) 38(196.8,70.8) 39(196.8,86.6) 40(196.8,102.3) 41(196.8,118.1) 42(196.8,133.8) 43(196.8,149.6) 44(196.8,165.3) 67(-196.8,165.3) 68(-196.8,149.6) 69(-196.8,133.8) 70(-196.8,118.1) 71(-196.8,102.3) 72(-196.8,86.6) 73(-196.8,70.8) 74(-196.8,55.1) 75(-196.8,39.3) 76(-196.8,23.6) 77(-196.8,7.8) 78(-196.8,-7.9) 79(-196.8,-23.7) 80(-196.8,-39.4) 81(-196.8,-55.2) 82(-196.8,-70.9) 83(-196.8,-86.7) 84(-196.8,-102.4) 85(-196.8,-118.2) 86(-196.8,-133.9) 87(-196.8,-149.6) 88(-196.8,-165.4)
  rect 303.1x303.1 smd paste-3937 mask+2: 89(0,0)
  silkscreen extent -200,-234 200,200, body extent -197,-197 197,197, height 30
R0402-L [mm] "贴片电阻0402, Body 1.0x0.5mm, 高密度"
  rect 0.6x0.5 smd: 1(-0.5,0) 2(0.5,0)
  silkscreen extent 0,-0.25 0,0.25, body extent -0.49,-0.25 0.5,0.26, height 0.38
R0402-S [mil] "C0402"
  round 20 smd: 1(-15.7,0) 2(15.9,0)
  silkscreen extent -31,-16 32,16, body extent -19,-10 20,10, height 15
R0603-L [mm] "贴片电阻0603 高密度"
  rect 0.8x0.9 smd: 1(-0.7,0) 2(0.7,0)
  silkscreen extent 0,-0.39 0,0.41, body extent -0.81,-0.43 0.79,0.39, height 0.53
R0603-M [mm] "贴片电阻0603 (1608)  低密度"
  rect 1.016x0.8 smd: 1(-0.8,0) 2(0.8,0)
  silkscreen extent 0,-0.39 0,0.41, body extent -0.81,-0.41 0.79,0.41, height 0.53
R0805-L [mm] "贴片电阻0805-高密度"
  rect 1x1.3 smd: 1(-0.838,0) 2(0.838,0)
  silkscreen extent 0,-0.64 0,0.64, body extent -0.99,-0.62 1.01,0.62, height 0.53
R1206-L [mm] "Register1206 (3216) for Startronics  高密度"
  rect 1x1.6 smd: 1(-1.45,0) 2(1.45,0)
  silkscreen extent -0.64,-0.56 0.64,0.58, body extent -1.58,-0.77 1.59,0.78, height 0.63
RJ45-TH_HR911130A [mil]
  rect 60x60 hole 35.83: 1(225.2,-271.45)
  round 60 hole 35.83: 2(179.1,-171.45) 3(125.2,-271.45) 4(79.1,-171.45) 5(25.2,-271.45) 6(-20.9,-171.45) 7(-74.8,-271.45) 8(-120.9,-171.45) 9(-174.8,-271.45) 10(-220.9,-171.45)
  round 66.93 hole 43.31: 11(260.83,271.46) 12(160.83,271.46) 13(-160.83,271.46) 14(-260.83,271.46)
  round 85 hole 66.93: 15(-304.92,-41.56) 16(304.92,-41.56)
  Keep-Out Layer board cut-out: 288.98,78.55 282.64,106.3 264.89,128.57 239.23,140.92 210.76,140.92 185.11,128.57 167.36,106.3 161.02,78.55 161.02,78.55 167.36,50.79 185.11,28.52 210.76,16.17 239.23,16.17 264.89,28.52 282.64,50.79 288.98,78.55
  Keep-Out Layer board cut-out: -161.02,78.55 -167.36,106.3 -185.11,128.57 -210.77,140.92 -239.24,140.92 -264.89,128.57 -282.64,106.3 -288.98,78.55 -288.98,78.55 -282.64,50.79 -264.89,28.52 -239.24,16.17 -210.77,16.17 -185.11,28.52 -167.36,50.79 -161.02,78.55
  silkscreen extent -316,-331 316,508, body extent -313,-335 313,508, height 512
SIL0008D_V [mm] "PSON, 8-Leads, Body 3.00x2.80mm, Pitch 0.65mm, Thermal Pad 1.90x1.1mm"
  rect 0.5x0.4 smd: 1(-1.05,0.975) 2(-1.05,0.325) 3(-1.05,-0.325) 4(-1.05,-0.975) 5(1.05,-0.975) 6(1.05,-0.325) 7(1.05,0.325) 8(1.05,0.975)
  rect 1.1x1.9 smd: 9(0,0)
  silkscreen extent -1.75,-1.58 1.4,1.58, body extent -1.4,-1.5 1.4,1.5, height 1.53
SMA_ANGLE [mil]
  rect 200x20 smd: 1(85,3.43)
  rect 200x40 smd: 2(85,101.85) 2(85,-95)
  rect 200x40 smd far side: 2(85,101.85) 2(85,-95)
  silkscreen extent -33,-115 -13,122, body extent -393,-115 142,121, height 137
SON50P200X200X80-8N [mm]
  rect 0.95x0.3 smd: 1(-0.9,0.75) 2(-0.9,0.25) 3(-0.9,-0.25) 4(-0.9,-0.75) 5(0.9,-0.75) 6(0.9,-0.25) 7(0.9,0.25) 8(0.9,0.75)
  silkscreen extent -1.5,-1 0.08,1.52, body extent -1,-1 1,1, height 0.8
SOT-23-3 [mm]
  rect 1.15x0.6 smd: 1(-1.13,0.96) 2(1.12,0.01) 3(-1.13,-0.94)
  silkscreen extent -2.11,-1.49 0.69,1.91, body extent -1.4,-1.45 1.4,1.45, height 1.2
SOT-143_L2.9-W1.3-P1.92-LS2.3-BL [mm]
  rect 1.1x0.7 smd paste+0 mask+0.05: 1(-0.75,-1.2)
  rect 0.6x0.7 smd paste+0 mask+0.05: 2(0.95,-1.2) 3(0.95,1.2) 4(-0.95,1.2)
  silkscreen extent -1.8,-1.24 1.55,0.7, body extent -1.48,-1.17 1.42,1.2, height 0.95
SW-PB2-SMD [mm] "贴片2脚微动开关"
  rect 2x2.5 smd: 1(0,3.556) 2(0,-3.444)
  silkscreen extent -2,-3.19 2,3.31, body extent -1.93,-3.94 1.92,3.95, height 2.5
SW-TH_MSK12C02 [mil]
  rect 23.6x60 smd: 1(-88.6,66.9) 2(29.5,66.9) 3(88.5,66.9)
  rect 47.2x27.6 smd: 4(-141.8,-67) 4(-141.8,23.6) 4(141.7,-67) 4(141.7,23.6)
  Keep-Out Layer board cut-out: 76.7,-21.7 76.3,-25.4 75.2,-28.9 73.3,-32.1 70.9,-34.8 67.9,-37 64.5,-38.5 60.9,-39.3 57.2,-39.3 53.5,-38.5 50.2,-37 47.2,-34.8 44.7,-32.1 42.8,-28.9 41.7,-25.4 41.3,-21.7 41.7,-18 42.8,-14.5 44.7,-11.3 47.2,-8.5 50.2,-6.3 53.5,-4.8 57.2,-4.1 60.9,-4.1 64.5,-4.8 67.9,-6.3 70.9,-8.5 73.3,-11.3 75.2,-14.5 76.3,-18 76.7,-21.7
  Keep-Out Layer board cut-out: -41.4,-21.7 -41.8,-25.4 -42.9,-28.9 -44.8,-32.1 -47.2,-34.8 -50.2,-37 -53.6,-38.5 -57.2,-39.3 -60.9,-39.3 -64.6,-38.5 -68,-37 -71,-34.8 -73.4,-32.1 -75.3,-28.9 -76.4,-25.4 -76.8,-21.7 -76.4,-18 -75.3,-14.5 -73.4,-11.3 -71,-8.5 -68,-6.3 -64.6,-4.8 -60.9,-4.1 -57.2,-4.1 -53.6,-4.8 -50.2,-6.3 -47.2,-8.5 -44.8,-11.3 -42.9,-14.5 -41.8,-18 -41.4,-21.7
  Keep-Out Layer region: 76.7,-21.7 76.3,-25.4 75.2,-28.9 73.3,-32.1 70.9,-34.8 67.9,-37 64.5,-38.5 60.9,-39.3 57.2,-39.3 53.5,-38.5 50.2,-37 47.2,-34.8 44.7,-32.1 42.8,-28.9 41.7,-25.4 41.3,-21.7 41.7,-18 42.8,-14.5 44.7,-11.3 47.2,-8.5 50.2,-6.3 53.5,-4.8 57.2,-4.1 60.9,-4.1 64.5,-4.8 67.9,-6.3 70.9,-8.5 73.3,-11.3 75.2,-14.5 76.3,-18 76.7,-21.7
  Keep-Out Layer region: 76.7,-21.7 76.3,-25.4 75.2,-28.9 73.3,-32.1 70.9,-34.8 67.9,-37 64.5,-38.5 60.9,-39.3 57.2,-39.3 53.5,-38.5 50.2,-37 47.2,-34.8 44.7,-32.1 42.8,-28.9 41.7,-25.4 41.3,-21.7 41.7,-18 42.8,-14.5 44.7,-11.3 47.2,-8.5 50.2,-6.3 53.5,-4.8 57.2,-4.1 60.9,-4.1 64.5,-4.8 67.9,-6.3 70.9,-8.5 73.3,-11.3 75.2,-14.5 76.3,-18 76.7,-21.7
  Keep-Out Layer region: -41.4,-21.7 -41.8,-25.4 -42.9,-28.9 -44.8,-32.1 -47.2,-34.8 -50.2,-37 -53.6,-38.5 -57.2,-39.3 -60.9,-39.3 -64.6,-38.5 -68,-37 -71,-34.8 -73.4,-32.1 -75.3,-28.9 -76.4,-25.4 -76.8,-21.7 -76.4,-18 -75.3,-14.5 -73.4,-11.3 -71,-8.5 -68,-6.3 -64.6,-4.8 -60.9,-4.1 -57.2,-4.1 -53.6,-4.8 -50.2,-6.3 -47.2,-8.5 -44.8,-11.3 -42.9,-14.5 -41.8,-18 -41.4,-21.7
  Keep-Out Layer region: -41.4,-21.7 -41.8,-25.4 -42.9,-28.9 -44.8,-32.1 -47.2,-34.8 -50.2,-37 -53.6,-38.5 -57.2,-39.3 -60.9,-39.3 -64.6,-38.5 -68,-37 -71,-34.8 -73.4,-32.1 -75.3,-28.9 -76.4,-25.4 -76.8,-21.7 -76.4,-18 -75.3,-14.5 -73.4,-11.3 -71,-8.5 -68,-6.3 -64.6,-4.8 -60.9,-4.1 -57.2,-4.1 -53.6,-4.8 -50.2,-6.3 -47.2,-8.5 -44.8,-11.3 -42.9,-14.5 -41.8,-18 -41.4,-21.7
  Keep-Out Layer lines w0.1: 76.7,-21.7 76.3,-18 75.2,-14.5 73.3,-11.3 70.9,-8.5 67.9,-6.3 64.5,-4.8 60.9,-4.1 57.2,-4.1 53.5,-4.8 50.2,-6.3 47.2,-8.5 44.7,-11.3 42.8,-14.5 41.7,-18 41.3,-21.7 41.7,-25.4 42.8,-28.9 44.7,-32.1 47.2,-34.8 50.2,-37 53.5,-38.5 57.2,-39.3 60.9,-39.3 64.5,-38.5 67.9,-37 70.9,-34.8 73.3,-32.1 75.2,-28.9 76.3,-25.4 76.7,-21.7 ; -41.4,-21.7 -41.8,-18 -42.9,-14.5 -44.8,-11.3 -47.2,-8.5 -50.2,-6.3 -53.6,-4.8 -57.2,-4.1 -60.9,-4.1 -64.6,-4.8 -68,-6.3 -71,-8.5 -73.4,-11.3 -75.3,-14.5 -76.4,-18 -76.8,-21.7 -76.4,-25.4 -75.3,-28.9 -73.4,-32.1 -71,-34.8 -68,-37 -64.6,-38.5 -60.9,-39.3 -57.2,-39.3 -53.6,-38.5 -50.2,-37 -47.2,-34.8 -44.8,-32.1 -42.9,-28.9 -41.8,-25.4 -41.4,-21.7
  silkscreen extent -134,-139 134,37, body extent -154,-134 154,71, height 59
TF-SMD_TF-01A [mm]
  rect 0.6x1.3 smd: 1(2.24,5.276) 2(1.14,5.276) 3(0.04,5.276) 4(-1.06,5.276) 5(-2.16,5.276) 6(-3.26,5.276) 7(-4.36,5.276) 8(-5.46,5.276) 9(-6.56,5.276)
  rect 1.2x1.4 smd: 10(-7.76,4.426) 13(6.92,4.426)
  rect 1.2x2 smd: 11(-7.76,-5.276) 12(7.76,-5.276)
  Keep-Out Layer board cut-out: -4.45,-5.566 -4.519,-5.318 -4.701,-5.137 -4.95,-5.071 -5.199,-5.137 -5.381,-5.318 -5.45,-5.566 -5.45,-5.566 -5.381,-5.814 -5.198,-5.995 -4.95,-6.061 -4.701,-5.995 -4.519,-5.814 -4.45,-5.566
  Keep-Out Layer board cut-out: 3.55,-5.566 3.481,-5.318 3.299,-5.137 3.05,-5.071 2.801,-5.137 2.619,-5.318 2.55,-5.566 2.55,-5.566 2.619,-5.814 2.802,-5.995 3.05,-6.061 3.299,-5.995 3.481,-5.814 3.55,-5.566
  Keep-Out Layer circle w0.025: c-4.95,-5.566 r0.5
  Keep-Out Layer circle w0.254: c-4.95,-5.566 r0.5
  Keep-Out Layer circle w0.025: c3.05,-5.566 r0.5
  Keep-Out Layer circle w0.254: c3.05,-5.566 r0.5
  silkscreen extent -7.37,-9.58 7.37,3.41, body extent -8.05,-12.13 8.05,5.69, height 2.05
TP [mil]
  round 60 smd: 1(0,0)
TYPE-C [mm]
  oval 1.2x2 hole 0.8 slot 1.6 at 90 deg: 0(-4.318,2.529) 0(4.322,2.529)
  oval 1.2x1.8 hole 0.8 slot 1.4 at 90 deg: 0(-4.318,-1.651) 0(4.322,-1.651)
  rect 0.3x1.15 smd: A1(-3.348,3.442) A4(-2.548,3.44) A5(-1.248,3.444) A6(-0.248,3.444) A7(0.252,3.442) A8(-1.748,3.444) A9(2.552,3.444) A12(3.352,3.444) B1(3.052,3.444) B4(2.252,3.444) B5(1.752,3.444) B6(0.752,3.444) B7(-0.748,3.442) B8(1.252,3.444) B9(-2.248,3.44) B12(-3.048,3.442)
  round 0.75 hole 0.75 unplated: ""(-2.888,1.999) ""(2.892,1.999)
  silkscreen extent -4.32,-4.01 4.32,3.45, body extent -4.52,-4.08 4.53,3.96, height 2.2
USB-C-SMD_TYC-324G [mm]
  oval 1.8x2.2 hole 1.3 slot 1.6 at 90 deg: 1(-4.191,1.905)
  oval 1.2x2.4 hole 0.6 slot 1.9 at 90 deg: 2(-4.32,-2.625) 3(4.32,-2.625)
  oval 1.8x2.2 hole 1.3 slot 1.6 at 90 deg copper offset 0,0: 4(4.191,1.905)
  rect 0.3x1 smd paste-100 mask+0.051: A1(-2.625,2.625) A2(-2.125,2.625) A3(-1.625,2.625) A4(-1.125,2.625) A5(-0.625,2.625) A6(-0.125,2.625) A7(0.375,2.625) A8(0.875,2.625) A9(1.375,2.625) A10(1.875,2.625) A11(2.375,2.625) A12(2.875,2.625) B1(2.625,1.275) B2(2.125,1.275) B3(1.625,1.275) B4(1.125,1.275) B5(0.625,1.275) B6(0.125,1.275) B7(-0.375,1.275) B8(-0.875,1.275) B9(-1.375,1.275) B10(-1.875,1.275) B11(-2.375,1.275) B12(-2.875,1.275)
  Keep-Out Layer board cut-out: 3.65,0.575 3.625,0.466 3.556,0.379 3.456,0.331 3.344,0.331 3.244,0.379 3.175,0.466 3.15,0.575 3.15,0.575 3.175,0.683 3.244,0.77 3.344,0.819 3.456,0.819 3.556,0.77 3.625,0.683 3.65,0.575
  Keep-Out Layer board cut-out: -3.15,0.575 -3.175,0.466 -3.244,0.379 -3.344,0.331 -3.456,0.331 -3.556,0.379 -3.625,0.466 -3.65,0.575 -3.65,0.575 -3.625,0.683 -3.556,0.77 -3.456,0.819 -3.344,0.819 -3.244,0.77 -3.175,0.683 -3.15,0.575
  Keep-Out Layer circle w0.025: c3.4,0.575 r0.25
  Keep-Out Layer circle w0.025: c-3.4,0.575 r0.25
  Keep-Out Layer region: 3.65,0.575 3.625,0.466 3.556,0.379 3.456,0.331 3.344,0.331 3.244,0.379 3.175,0.466 3.15,0.575 3.15,0.575 3.175,0.683 3.244,0.77 3.344,0.819 3.456,0.819 3.556,0.77 3.625,0.683 3.65,0.575
  Keep-Out Layer region: -3.15,0.575 -3.175,0.466 -3.244,0.379 -3.344,0.331 -3.456,0.331 -3.556,0.379 -3.625,0.466 -3.65,0.575 -3.65,0.575 -3.625,0.683 -3.556,0.77 -3.456,0.819 -3.344,0.819 -3.244,0.77 -3.175,0.683 -3.15,0.575
  silkscreen extent -4.5,-5.33 4.5,2.68, body extent -4.63,-5.42 4.63,2.68, height 3.1
WPDFN-8_L8.0-W6.0-P1.27-EP-BL [mil]
  rect 27.6x47.2 smd: 1(-75,-154.4) 2(-25,-154.4) 3(25,-154.4) 4(75,-154.4) 5(75,154.3) 6(25,154.3) 7(-25,154.3) 8(-75,154.3)
  rect 169.3x133.9 smd: 9(0,0)
  silkscreen extent -126,-205 126,165, body extent -118,-158 118,158, height 32
WQFN-40_L5.0-W5.0-P0.4-BL-EP [mm]
  oval 0.2x0.8 smd paste-100 mask+0.051: 1(-1.801,-2.499) 2(-1.4,-2.499) 3(-1.001,-2.499) 4(-0.599,-2.499) 5(-0.201,-2.499) 6(0.201,-2.499) 7(0.599,-2.499) 8(1.001,-2.499) 9(1.4,-2.499) 10(1.801,-2.499) 21(1.801,2.499) 22(1.4,2.499) 23(1.001,2.499) 24(0.599,2.499) 25(0.201,2.499) 26(-0.201,2.499) 27(-0.599,2.499) 28(-1.001,2.499) 29(-1.4,2.499) 30(-1.801,2.499)
  oval 0.8x0.2 smd paste-100 mask+0.051: 11(2.499,-1.801) 12(2.499,-1.4) 13(2.499,-1.001) 14(2.499,-0.599) 15(2.499,-0.201) 16(2.499,0.201) 17(2.499,0.599) 18(2.499,1.001) 19(2.499,1.4) 20(2.499,1.801) 31(-2.499,1.801) 32(-2.499,1.4) 33(-2.499,1.001) 34(-2.499,0.599) 35(-2.499,0.201) 36(-2.499,-0.201) 37(-2.499,-0.599) 38(-2.499,-1.001) 39(-2.499,-1.4) 40(-2.499,-1.801)
  rect 3.8x3.8 smd paste-100 mask+0.051: 41(0,0)
  silkscreen extent -2.7,-3.35 2.7,2.7, body extent -2.55,-2.55 2.55,2.55, height 0.9
WS2812C2020 [mm]
  rect 0.7x0.7 smd: 1(0.915,-0.55) 2(0.915,0.55) 3(-0.915,0.55) 4(-0.915,-0.55)
  silkscreen extent -0.4,-1.6 1,1, body extent -1.1,-1 1.1,1, height 0.7
XTAL-3Pin [mm] "贴片晶振"
  rect 0.55x1.45 smd: 1(-0.95,0) 2(0,0) 3(0.95,0)
  silkscreen extent -1.65,-0.89 1.65,0.91, body extent -1.6,-0.74 1.6,0.76, height 0.8
XTAL-2520 [mil] "晶振"
  rect 24.8x30.7 smd: 1(-37.8,-25) 2(37.8,-25) 3(37.8,25) 4(-37.8,25)
  silkscreen extent -89,-53 63,51, body extent -50,-40 50,40, height 28
螺丝孔 [mil]
  round 200 smd paste+0: 1(0,0)

## Part data
B2: "Clock Buffer 4-channel output LVC MOS 1.8-V buffer", Manufacturer_Name="Texas Instruments", Mouser Part Number=595-LMK1C1104DQFR, Arrow Part Number=LMK1C1104DQFR, Arrow Price/Stock=https://www.arrow.com/en/products/lmk1c1104dqfr/texas-instruments?utm_currency=USD&region=nac, Datasheet Link=https://www.ti.com/lit/ds/symlink/lmk1c1104.pdf?ts=1625794058723&ref_url=https%253A%252F%252Fwww.ti.com%252Fproduct%252FLMK1C1104, Geometry.Height=0.8mm, Manufacturer_Part_Number=LMK1C1104DQFR, Mouser Price/Stock=https://www.mouser.co.uk/ProductDetail/Texas-Instruments/LMK1C1104DQFR?qs=QNEnbhJQKvYdwt0bSAj%252Blw%3D%3D
C1 C2 C3 C4 C5 C6 C7 C8 C9 C10 C11 C12 C13 C14 C15 C16 C17 C18 C19 C20 C21 C22 C23 C24 C25 C26 C27 C28 C29 C30 C31 C32 C33 C34 C35 C36 C37 C38 C39 C40 C41 C42 C43 C44 C45 C46 C47 C48 C49 C50 C51 C52 C53 C54 C55 C56 C57 C58 C59 C60 C61 C62 C63 C64 C65 C66 C67 C68 C69 C70 C71 C72 C73 C74 C75 C76 C77 C78 C79 C80 C81 C82 C83 C84 C85 C86 C87 C88 C89 C90 C91 C92 C93 C94 C95 C96 C97 C98 C99 C100 C101 C102 C103 C104 C105 C106 C107 C108 C109 C110 C111 C112 C113 C114 C115 C116 C117 C118 C119 C120 C121 C122 C123 C124 C125 C126 C127 C128 C129 C130 C131 C132 C133 C134 C135 C136 C137 C138 C139 C140 C141 C142 C143 C144 C145 C146 C147 C148 C149 C150 C151 C152 C153 C154 C155 C156 C157 C158 C159 C160 C161 C162 C163 C164 C165 C166 C167 C168 C169 C170 C171 C172 C173 C174 C175 C176 C177 C178 C179 C180 C181 C182 C183 C184 C185 C186 C187 C188 C189 C190 C191 C192 C193 C194 C195 C196 C197 C198 C199 C200 C201 C202 C203 C204 C205 C206 C207 C208 C209 C210 C211 C212 C213 C214 C215 C216 C217 C218 C219 C220 C221 C222 C223 C224 C225 C226 C227 C228 C229 C230 C231 C232 C233 C234 C235 C236 C237 C238 C239 C240 C241 C242 C243 C244 C245 C246 C247 C248 C249 C250 C251 C252 C253 C254 C255 C256 C257 C258 C259 C260 C261 C262 C263 C264 C265 C266 C267 C268 C269 C270 C271 C272 C273 C274 C275 C276 C277 C278 C279 C280 C281 C282 C283 C284 C285 C286 C287 C288 C289 C290 C291 C292 C293 C294 C296 C297 C298 C299 C300 C301 C302 C303 C304 C305 C306 C307 C308 C309: "贴片瓷片电容"
D1 D2 D3 D5: "发光二极管"
D4: "Intelligent control LED integrated light source", Manufacturer_Name=Worldsemi, Datasheet Link=http://www.world-semi.com/DownLoadFile/139, Geometry.Height=0.84mm, Manufacturer_Part_Number=WS2812C-2020
J1 J9 J10 J11: library part IPEX4
J3 J6: library part CMP-03913-103227005-2, "Rf Coaxial, Mmcx Jack, 50 Ohm, Pcb Rohs Compliant: Yes", Insulation Resistance=1GΩ, Max Operating Temperature=155°C, Min Operating Temperature=-55°C, Connector Type=MMCX, Impedance=50Ω, Insertion Loss (dB)=0.25dB, Insulation Material=PTFE, Packaging="Tape and Reel"
J4: "TF卡卡槽"
J12: library part TYPE-C-USB3, "USB3.0的typec接口", Current Rating - Power (Max)=5A, JLCPCB Part Class="Extended Part", LCSC Part Name="Type-C 母", Manufacturer="XKB Connection(中国星坤)", Operating Temperature Range=-40℃~+85℃, Soldering Temperature(Max)=260℃, Add into BOM=yes, Connector Type=Type-C, Contact Material=高导铜, Contact Plating=金, Convert to PCB=yes, Datasheet=https://atta.szlcsc.com/upload/public/pdf/source/20211015/8B22A47B12BDC5CD319611427B3C1C1B.pdf, Device=U262-241N-4BV64, Gender=母, Manufacturer Part=U262-241N-4BV64, Mounting Style=-, Number of Contacts=24P, Number Of Ports=1, Standard=-, Supplier=LCSC, Supplier Footprint=SMD, Supplier Part=C388660, Symbol=U262-241N-4BV64
L1 L2 L3 L4 L5 R1 R2 R3 R4 R5 R6 R7 R8 R9 R10 R11 R12 R13 R14 R15 R16 R17 R18 R19 R20 R21 R22 R23 R24 R25 R26 R27 R28 R29 R30 R31 R32 R33 R34 R35 R36 R37 R38 R39 R40 R41 R42 R43 R44 R45 R46 R47 R48 R49 R50 R51 R52 R53 R54 R55 R56 R57 R58 R59 R60 R61 R62 R63 R64 R65 R66 R67 R68 R69 R70 R71 R72 R73 R74 R75 R76 R77 R78 R79 R80 R82 R83 R84 R85 R86 R87 R88 R89 R90 R91 R92 R93 R94 R95 R96 R97 R98 R99 R100 R101 R102 R103 R104 R105 R106 R107 R108 R109 R110 R111 R112 R113 R114 R115 R116 R117 R118 R119 R120 R121 R122 R123 R124 R125 R126 R127 R128 R129 R130 R131 R132 R133 R134 R135 R136 R137 R138 R139 R140 R141 R142 R143 R144 R145: library part Res, "贴片电阻"
L8 L9 L10 L11: library part L
Q2 Q3: library part CMP-04962-000055-1, "MOSFET N-CH 30V 35A 8VSON", Continuous Drain Current (ID)=20A, Drain to Source Voltage (Vdss)=30V, Gate to Source Voltage (Vgs)=20V, Input Capacitance=998pF, Max Operating Temperature=150°C, Max Power Dissipation=3.2W, Min Operating Temperature=-55°C, Contact Plating=Copper, Element Configuration=Single, Fall Time=1ns, Lead Free="Lead Free", Mount="Surface Mount", Number of Pins=8, Packaging="Tape and Reel", Rds On Max=10.2mR, Rise Time=5ns, RoHS Compliant=Yes, Turn-Off Delay Time=11ns, Turn-On Delay Time=2ns
S1 S2: "贴片式2脚微动开关"
S3: "SPDT Subminiature Toggle Switch, Right Angle Mounting, Vertical Actuation", ComponentLink1Description="Manufacturer Link", ComponentLink1URL=http://www.apem.com
T1 T2 T3 T4: library part CMP-199822-000001-1, "1:1 CORE & WIRE Transformer, 10 - 6000 MHz, 50Ω", Frequency=10-6000MHz, Manufacturer=Mini-Circuits, Package=0, Temperature="-40°C to +85°C", Temperature Range High=+85°C, Temperature Range Low=-40°C, Automotive=No, Category=Trans, ComponentLink2Description=Datasheet, ComponentLink2URL=https://www.minicircuits.com/pdfs/TCM1-63AX+.pdf, Device Class L1="Passive Components", Device Class L2=Transformers, Device Class L3=unset, Height=4.06mm, Insertion Loss=1.16-1.8dB, Lead Free=Yes, Manufacturer Part Number=TCM1-63AX+, Octopart=https://octopart.com/tcm1-63ax%2B-mini-circuits-107315723, Return Loss=9.42-16.9dB, RoHS=TRUE, Turns Ratio=1:1
TP1 TP2: library part TP
U1: library part CMP-0363-00003-3, "733 MHz Zynq™-7000 AP SoC, 130 PS I/O, 125 FPGA I/O, 400-Ball BGA, Speed Grade 2, Industrial Grade, Pb-Free", Generic Part Number=XC7Z020, Code_JEDEC=MO-275-MMAA-1, ComponentLink1Description=Datasheet, ComponentLink1URL=http://www.xilinx.com/support/documentation/data_sheets/ds190-Zynq-7000-Overview.pdf, ComponentLink2Description="Package Specification", ComponentLink2URL=http://www.xilinx.com/support/documentation/user_guides/ug865-Zynq-7000-Pkg-Pinout.pdf, ComponentLink3Description="DC and AC Switching Characteristics", ComponentLink3URL=http://www.xilinx.com/support/documentation/data_sheets/ds187-XC7Z010-XC7Z020-Data-Sheet.pdf, ComponentLink4Description="Package File", ComponentLink4URL=http://www.xilinx.com/support/packagefiles/z7packages/xc7z020clg400pkg.txt, ComponentLink5Description="Packaging and Pinout", ComponentLink5URL=http://www.xilinx.com/support/documentation/user_guides/ug865-Zynq-7000-Pkg-Pinout.pdf, ComponentLink6Description="PCB and Layout Guide", ComponentLink6URL=http://www.xilinx.com/support/documentation/user_guides/ug483_7Series_PCB.pdf, DatasheetVersion=v1.2, Extensible Block RAM (# 36Kb Blocks)="560 KB (140)", Flip Flops=106400, LUTs=53200, Mounting Technology="Surface Mount", PackageDescription="Wire-Bond Chip-Scale BGA, Body 17 x 17 mm, 0.8 mm Pitch", PackageReference=CLG400, PackageVersion="Rev 1.1, 09/2012", PartNumber=XC7Z020-2CLG400I, RoHS=Pb-Free, Speed Grade=-2
U2 U3: library part CMP-2000-07475-2, "IC DRAM 4G PARALLEL 96FBGA", Manufacturer=Micron, Max Supply Voltage=1.45V, Min Supply Voltage=1.283V, Nominal Supply Current=12-156mA, Package=TW, Temperature="0°C to +85°C", Temperature Range High=+85°C, Temperature Range Low=0°C, Access Time=1.07ns, Automotive=No, Category=IC, ComponentLink2Description=Datasheet, ComponentLink2URL=https://www.micron.com/-/media/client/global/documents/products/data-sheet/dram/ddr3/4gb_ddr3l.pdf, Device Class L1="Integrated Circuits (ICs)", Device Class L2=Memory, Device Class L3=RAM, Digikey Description="IC DRAM 4G PARALLEL 96FBGA", Height=1.2mm, Interface=Parallel, Lead Free=Yes, Manufacturer Part Number=MT41K256M16TW-107:P, Memory Size=4Gbits, Memory Type=SDRAM,DDR3, Octopart=https://octopart.com/mt41k256m16tw-107%3Ap-micron-66533852, RoHS=TRUE, Standoff Height=0.29mm
U5: library part CMP-04899-000066-1, "IC TRNSLTR BIDIRECTIONAL 20VQFN", Case/Package=VQFN, High Level Output Current=-50mA, Low Level Output Current=50mA, Max Operating Temperature=85°C, Max Supply Voltage=5.5V, Min Operating Temperature=-40°C, Min Supply Voltage=1.2V, Package Quantity=1, Quiescent Current=3uA, Data Rate=60Mbps, Lead Free="Lead Free", Logic Function=Translator, Mount="Surface Mount", Number of Bits=8, Number of Channels=8, Number of Inputs=8, Number of Pins=20, Output Type=Voltage, Packaging="Tape and Reel", Propagation Delay=4.8ns, Radiation Hardening=No, REACH SVHC="No SVHC", RoHS Compliant=Yes, Series=-, Turn-On Delay Time=312ns, Weight=0.001517oz
U6: library part RTL8211F-CG, JLCPCB Part Class="Extended Part", LCSC Part Name=集成10/100/1000M以太网精密收发器, Manufacturer=REALTEK(瑞昱), Supply Voltage=1.8V；2.5V；3.3V；1.5V, Add into BOM=yes, Application Function=-, Convert to PCB=yes, Datasheet=https://atta.szlcsc.com/upload/public/pdf/source/20190902/C187932_1913F3711F05FE1324DF2946D70D648D.pdf, Device=RTL8211F-CG, Interface=RGMII, Manufacturer Part=RTL8211F-CG, Number of Channels=4, Supplier=LCSC, Supplier Footprint=WQFN-40-EP(5x5), Supplier Part=C187932, Symbol=RTL8211F-CG
U7 U27: library part CMP-0326-00046-3, "ESD Solution for Super-Speed (6 Gbps) USB 3.0 Interface, 2 Channels, -40 to +85 degC, 3-pin SOT (DRT), Green (Rohs & No Sb/Br)", Breakdown Voltage(Min)(V)=9, Differential Capacitance(pF)=0.01, IO Capacitance(Typ)(pF)=0.7, IO Leakage Current(nA)=10, Manufacturer="Texas Instruments", 1394 / Firewire=TRUE, ComponentLink1Description=Datasheet, ComponentLink1URL=http://www.ti.com/general/docs/lit/getliterature.tsp?genericPartNumber=TPD2EUSB30&fileType=pdf, ComponentLink2Description="URL Link1", ComponentLink2URL=SamplesURL:http://www.ti.com/product/tpd2eusb30#samples, DatasheetVersion=SLVSAC2C, Eco-Plan="Green (RoHS & no Sb/Br)", HDMI=TRUE, IEC 61000-4-2 Air-Gap(+/- kV)=8, IEC 61000-4-2 Contact(+/- kV)=8, Mounting Technology="Surface Mount", PackageDescription="3-Flat Lead Plastic Small Outline, 1 x 1 mm (inc leads), 0.35 mm Pitch", PackageReference=DRT0003A, PackageVersion="revD, Jun-2008", PartNumber=TPD2EUSB30DRTR, Serial ATA / eSATA=TRUE, SubFamily="ESD Solution", USB Full Speed=TRUE, USB High Speed=TRUE, USB Super Speed=TRUE
U8: library part CMP-0162-00356-2, "IC EEPROM 2K SPI 2MHZ SOT23-6", Case/Package=SOT-23, Frequency=2MHz, Max Operating Temperature=85°C, Max Supply Voltage=5.5V, Min Operating Temperature=-40°C, Min Supply Voltage=2.5V, Nominal Supply Current=2mA, Package Quantity=3000, Access Time=250ns, Contact Plating=Tin, Density=2Kb, Height=1.3mm, Interface=Serial, Lead Free="Lead Free", Length=3.1mm, Max Frequency=2MHz, Memory Size=2Kb, Memory Type=EEPROM, Mount="Surface Mount", Number of Pins=6, Packaging="Tape and Reel", Radiation Hardening=No, REACH SVHC="No SVHC", Width=1.8mm
U9: JLCPCB Part Class="Extended Part", LCSC Part Name="检测复位IC  HX811T", Manufacturer=HX(恒佳兴), Add into BOM=yes, Convert to PCB=yes, Datasheet=https://atta.szlcsc.com/upload/public/pdf/source/20181119/C296130_13C074D56463349345A6B8D040F0FFA0.pdf, Device=HX811T, Manufacturer Part=HX811T, Supplier=LCSC, Supplier Footprint=SOT-143, Supplier Part=C296128, Symbol=HX811T
U10: "Dual High Speed USB to Multipurpose UART / FIFO IC / , 3 to 3.6 V, -40 to 85 degC, 64- Pin LQFP, RoHS", Manufacturer=FTDI, Maximum Operating Temperature=+85°C, Minimum Operating Temperature=-40°C, Package Description="64-Pin Low-profile Quad Flat Package, Body 10 x 10 mm, Pitch 0.5 mm", Package Reference=LQFP-64, Package Type=LQFP, Datasheet URL=http://www.ftdichip.com/Support/Documents/DataSheets/ICs/DS_FT2232H.pdf, Datasheet Version="Rev. 2.5, 07/2016", Dimensions=10x10x1.4mm, Height=1.4mm, Length=10mm, Manufacturer URL=http://www.nxp.com/, Maximum Data Rate=480Mbit/s, Mounting Technology=SurfaceMount, Mounting Type=SurfaceMount, Number of Channels per Chip=2, Pin Count=64, Standard Supported=RS232,RS422,RS485, Width=10mm